# Altium PCB PCB1.PcbDoc
Units mm, origin at the board's own origin, x right, y up, seen from the top; angles counter-clockwise.
Board outline 100.24 x 20.75 mm, 2 copper layers (Top Layer, Bottom Layer); 2 components, 4 nets, 340 pads, 0 vias.
Unrouted connection lines stored in the file: 144.
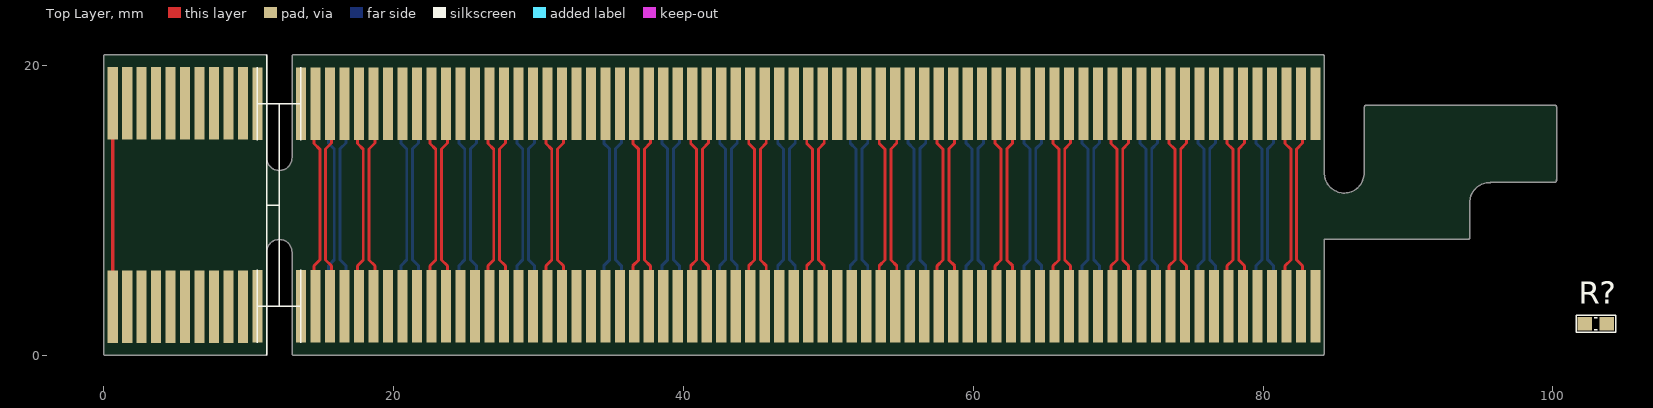
[diagram p0: Top Layer view]
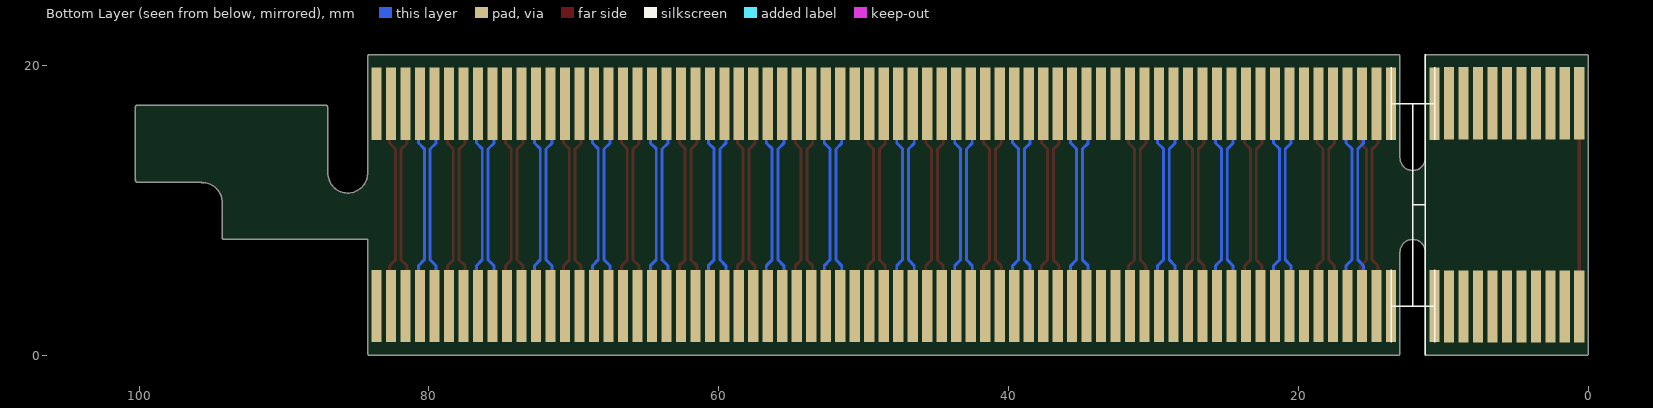
[diagram p1: Bottom Layer view, seen from below]

## Layer stack, top to bottom
Top Solder: solder mask 0.0102, Solder Resist, Dk 3.5
Top Layer: signal copper 0.0356
Dielectric 1: dielectric 0.32, FR-4, Dk 4.8
Bottom Layer: signal copper 0.0356
Bottom Solder: solder mask 0.0102, Solder Resist, Dk 3.5

## Board outline
0.127,0 cw(c0.127,0.127) 0,0.127 0,20.625 cw(c0.127,20.625) 0.127,20.752 11.125,20.752 cw(c11.125,20.625) 11.253,20.625 11.253,13.648 cw(c11.127,13.627) 11.254,13.627 ccw(c12.127,13.627) 13,13.627 cw(c13.127,13.627) 13.004,13.662 13.004,20.625 cw(c13.132,20.625) 13.132,20.752 84.099,20.752 cw(c84.099,20.625) 84.227,20.625 84.227,12.511 ccw(c85.598,12.573) 86.971,12.573 cw(c87.098,12.573) 86.995,12.647 86.995,17.145 cw(c87.122,17.145) 87.122,17.272 100.117,17.272 cw(c100.117,17.145) 100.244,17.145 100.244,12.141 cw(c100.117,12.141) 100.239,12.103 cw(c100.117,12.065) 100.244,12.065 cw(c100.117,12.065) 100.117,11.938 95.705,11.938 cw(c95.631,12.041) 95.631,11.914 ccw(c95.631,10.541) 94.258,10.541 cw(c94.131,10.541) 94.256,10.519 cw(c94.132,10.49) 94.26,10.49 94.26,8.127 cw(c94.132,8.127) 94.132,8 84.208,8 84.208,0.127 cw(c84.081,0.127) 84.081,0 13.132,0 cw(c13.132,0.127) 13.004,0.127 13.004,7.092 cw(c13.127,7.127) 13,7.127 ccw(c12.127,7.127) 11.254,7.127 cw(c11.127,7.127) 11.253,7.106 11.253,0.127 cw(c11.125,0.127) 11.125,0

## Design rules (kind name [scope] priority, off if disabled: settings)
Clearance [All] p1: gap=0.254 ignorepadtopadclearanceinfootprint=FALSE except(0: Arc-Hole Track-Hole SMDPad-Hole THPad-Hole Via-Hole Fill-Hole Poly-Hole Region-Hole Text-Hole)
DiffPairsRouting [All] p1: maxlimit=0.254 minlimit=0.15 mostfreqgap=0.2 toplayer_minwidth=0.15 toplayer_maxwidth=0.2 toplayer_prefwidth=0.15 bottomlayer_minwidth=0.15 bottomlayer_maxwidth=0.2 bottomlayer_prefwidth=0.15 maxuncoupledlength=12.7
PolygonConnect [All] p1: connectstyle=Relief reliefconductorwidth=0.254 reliefentries=4 polygonreliefangle="90 Angle" airgapwidth=0.254
RoomDefinition Sheet1 [InComponentClass('Sheet1')] p1: confinementstyle=ConfineIn formatcopy=TRUE lockcomponents=FALSE outline 101.397,1.422 104.724,1.422 104.724,5.486 101.397,5.486
RoutingVias [All] p1: holewidth=0.711 width=1.27 viastyle="Through Hole" minholewidth=0.711 minwidth=1.27 maxholewidth=0.711 maxwidth=1.27
SolderMaskExpansion [All] p1: expansion=0.102 istentingtop=FALSE
Width [All] p1: maxlimit=0.254 minlimit=0.254 preferedwidth=0.254
29 further rules are at their usual default settings.

## Classes and differential pairs
component class Sheet1: R?
differential pair visai: +visai_P -visai_N

## Components (designator, comment, footprint, x,y, rotation, side; value= is the part's Value field where it differs from the comment)
R? "0R" "tro smd 0603" 102.946,2.184 r0 top
R? "0R" "tro smd 0603" 102.946,2.184 r0 top

## Footprints (in the part's own frame and the unit in brackets; to place one, negate y for a bottom-side part, rotate by r counter-clockwise, add the part's x,y. Pads: shape width x height; smd on the part's side, far side on the other; paste and mask are expansions set on the pad)
"tro smd 0603" [mm] "Chip Capacitor, 2-Leads, Body 1,60x0,80mm, IPC Medium Density"
  rect 1x0.95 smd mask+0.076: 1(-0.75,0) 2(0.75,0)
  silkscreen extent -1.35,-0.58 1.37,0.58, body extent -0.82,-0.42 0.82,0.43, height 0.44

## Part data
R? R?: library part "Tro 0603 1% 0R", "Dán", Chung_Loai=Dán, Don_Vi=Con, Ma_Hang=MH005792, So_Chan=2, Ten_Linh_Kien="Trở 0603 1% 0R"

## Free pads (board coordinates)
  rect 0.7x5 smd far side: A0(0.628,3.372) A0(0.628,17.403) A1(1.628,3.372) A1(1.628,17.403) A2(2.628,3.372) A2(2.628,17.403) A3(3.628,3.372) A3(3.628,17.403) A4(4.628,3.372) A4(4.628,17.403) A5(5.628,3.372) A5(5.628,17.403) A6(6.628,3.372) A6(6.628,17.403) A7(7.628,3.372) A7(7.628,17.403) A8(8.628,3.372) A8(8.628,17.403) A9(9.628,17.403) A9(9.628,3.372) A10(10.613,3.407) A10(10.613,17.368) A11(10.613,3.407) A11(10.613,17.368) A11(13.618,3.407) A11(13.618,3.407) A11(13.618,17.368) A11(13.618,17.368) A12(14.618,3.407) A12(14.618,17.368) A13(15.618,3.407) A13(15.618,17.368) A14(16.618,3.407) A14(16.618,17.368) A15(17.618,3.407) A15(17.618,17.368) A16(18.618,3.407) A16(18.618,17.368) A17(19.618,3.407) A17(19.618,17.368) A18(20.618,3.407) A18(20.618,17.368) A19(21.618,3.407) A19(21.618,17.368) A20(22.618,3.407) A20(22.618,17.368) A21(23.618,3.407) A21(23.618,17.368) A22(24.618,3.407) A22(24.618,17.368) A23(25.618,3.407) A23(25.618,17.368) A24(26.618,3.407) A24(26.618,17.368) A25(27.618,3.407) A25(27.618,17.368) A26(28.618,3.407) A26(28.618,17.368) A27(29.618,3.407) A27(29.618,17.368) A28(30.618,3.407) A28(30.618,17.368) A29(31.618,3.407) A29(31.618,17.368) A30(32.618,3.407) A30(32.618,17.368) A31(33.618,3.407) A31(33.618,17.368) A32(34.618,3.407) A32(34.618,17.368) A33(35.618,3.407) A33(35.618,17.368) A34(36.618,3.407) A34(36.618,17.368) A35(37.618,3.407) A35(37.618,17.368) A36(38.618,3.407) A36(38.618,17.368) A37(39.618,3.407) A37(39.618,17.368) A38(40.618,3.407) A38(40.618,17.368) A39(41.618,3.407) A39(41.618,17.368) A40(42.618,3.407) A40(42.618,17.368) A41(43.618,3.407) A41(43.618,17.368) A42(44.618,3.407) A42(44.618,17.368) A43(45.618,3.407) A43(45.618,17.368) A44(46.618,3.407) A44(46.618,17.368) A45(47.618,3.407) A45(47.618,17.368) A46(48.618,3.407) A46(48.618,17.368) A47(49.618,3.407) A47(49.618,17.368) A48(50.618,3.407) A48(50.618,17.368) A49(51.618,3.407) A49(51.618,17.368) A50(52.618,3.407) A50(52.618,17.368) A51(53.618,3.407) A51(53.618,17.368) A52(54.618,3.407) A52(54.618,17.368) A53(55.618,3.407) A53(55.618,17.368) A54(56.618,3.407) A54(56.618,17.368) A55(57.618,3.407) A55(57.618,17.368) A56(58.618,3.407) A56(58.618,17.368) A57(59.618,3.407) A57(59.618,17.368) A58(60.618,3.407) A58(60.618,17.368) A59(61.618,3.407) A59(61.618,17.368) A60(62.618,3.407) A60(62.618,17.368) A61(63.618,3.407) A61(63.618,17.368) A62(64.618,3.407) A62(64.618,17.368) A63(65.618,3.407) A63(65.618,17.368) A64(66.618,3.407) A64(66.618,17.368) A65(67.618,3.407) A65(67.618,17.368) A66(68.618,3.407) A66(68.618,17.368) A67(69.618,3.407) A67(69.618,17.368) A68(70.618,3.407) A68(70.618,17.368) A69(71.618,3.407) A69(71.618,17.368) A70(72.618,3.407) A70(72.618,17.368) A71(73.618,3.407) A71(73.618,17.368) A72(74.618,3.407) A72(74.618,17.368) A73(75.618,3.407) A73(75.618,17.368) A74(76.618,3.407) A74(76.618,17.368) A75(77.618,3.407) A75(77.618,17.368) A76(78.618,3.407) A76(78.618,17.368) A77(79.618,3.407) A77(79.618,17.368) A78(80.618,3.407) A78(80.618,17.368) A79(81.618,3.407) A79(81.618,17.368) A80(82.618,3.407) A80(82.618,17.368) A81(83.618,3.407) A81(83.618,17.368)
  rect 0.7x5 smd: A0(0.628,3.361) A0(0.628,17.391) A1(1.628,3.361) A1(1.628,17.391) A2(2.628,3.361) A2(2.628,17.391) A3(3.628,3.361) A3(3.628,17.391) A4(4.628,3.361) A4(4.628,17.391) A5(5.628,3.361) A5(5.628,17.391) A6(6.628,3.361) A6(6.628,17.391) A7(7.628,3.361) A7(7.628,17.391) A8(8.628,3.361) A8(8.628,17.391) A9(9.628,17.391) A9(9.628,3.361) A10(10.614,3.395) A10(10.614,17.356) A11(10.614,3.395) A11(10.614,17.356) A11(13.618,3.395) A11(13.618,3.395) A11(13.618,17.356) A11(13.618,17.356) A12(14.618,3.395) A12(14.618,17.356) A13(15.618,3.395) A13(15.618,17.356) A14(16.618,3.395) A14(16.618,17.356) A15(17.618,3.395) A15(17.618,17.356) A16(18.618,3.395) A16(18.618,17.356) A17(19.618,3.395) A17(19.618,17.356) A18(20.618,3.395) A18(20.618,17.356) A19(21.618,3.395) A19(21.618,17.356) A20(22.618,3.395) A20(22.618,17.356) A21(23.618,3.395) A21(23.618,17.356) A22(24.618,3.395) A22(24.618,17.356) A23(25.618,3.395) A23(25.618,17.356) A24(26.618,3.395) A24(26.618,17.356) A25(27.618,3.395) A25(27.618,17.356) A26(28.618,3.395) A26(28.618,17.356) A27(29.618,3.395) A27(29.618,17.356) A28(30.618,3.395) A28(30.618,17.356) A29(31.618,3.395) A29(31.618,17.356) A30(32.618,3.395) A30(32.618,17.356) A31(33.618,3.395) A31(33.618,17.356) A32(34.618,3.395) A32(34.618,17.356) A33(35.618,3.395) A33(35.618,17.356) A34(36.618,3.395) A34(36.618,17.356) A35(37.618,3.395) A35(37.618,17.356) A36(38.618,3.395) A36(38.618,17.356) A37(39.618,3.395) A37(39.618,17.356) A38(40.618,3.395) A38(40.618,17.356) A39(41.618,3.395) A39(41.618,17.356) A40(42.618,3.395) A40(42.618,17.356) A41(43.618,3.395) A41(43.618,17.356) A42(44.618,3.395) A42(44.618,17.356) A43(45.618,3.395) A43(45.618,17.356) A44(46.618,3.395) A44(46.618,17.356) A45(47.618,3.395) A45(47.618,17.356) A46(48.618,3.395) A46(48.618,17.356) A47(49.618,3.395) A47(49.618,17.356) A48(50.618,3.395) A48(50.618,17.356) A49(51.618,3.395) A49(51.618,17.356) A50(52.618,3.395) A50(52.618,17.356) A51(53.618,3.395) A51(53.618,17.356) A52(54.618,3.395) A52(54.618,17.356) A53(55.618,3.395) A53(55.618,17.356) A54(56.618,3.395) A54(56.618,17.356) A55(57.618,3.395) A55(57.618,17.356) A56(58.618,3.395) A56(58.618,17.356) A57(59.618,3.395) A57(59.618,17.356) A58(60.618,3.395) A58(60.618,17.356) A59(61.618,3.395) A59(61.618,17.356) A60(62.618,3.395) A60(62.618,17.356) A61(63.618,3.395) A61(63.618,17.356) A62(64.618,3.395) A62(64.618,17.356) A63(65.618,3.395) A63(65.618,17.356) A64(66.618,3.395) A64(66.618,17.356) A65(67.618,3.395) A65(67.618,17.356) A66(68.618,3.395) A66(68.618,17.356) A67(69.618,3.395) A67(69.618,17.356) A68(70.618,3.395) A68(70.618,17.356) A69(71.618,3.395) A69(71.618,17.356) A70(72.618,3.395) A70(72.618,17.356) A71(73.618,3.395) A71(73.618,17.356) A72(74.618,3.395) A72(74.618,17.356) A73(75.618,3.395) A73(75.618,17.356) A74(76.618,3.395) A74(76.618,17.356) A75(77.618,3.395) A75(77.618,17.356) A76(78.618,3.395) A76(78.618,17.356) A77(79.618,3.395) A77(79.618,17.356) A78(80.618,3.395) A78(80.618,17.356) A79(81.618,3.395) A79(81.618,17.356) A80(82.618,3.395) A80(82.618,17.356) A81(83.618,3.395) A81(83.618,17.356)

## Nets (pads, with @x,y where several pads share a name; then routed paths per layer and width w, separated by ;. In a path a pad name is that pad's centre, name@x,y a point inside that pad or via, vN(x,y) a via of type N, cw(c..) or ccw(c..) an arc to the next point about the centre after c; other vN are vias at no path point)
GND: pad.A11@13.618,3.395 pad.A11@13.618,17.356 pad.A12@14.618,3.407 pad.A12@14.618,17.368 pad.A14@16.618,3.395 pad.A14@16.618,17.356 pad.A15@17.618,3.407 pad.A15@17.618,17.368 pad.A17 pad.A19@21.618,3.395 pad.A19@21.618,17.356 pad.A20@22.618,3.407 pad.A20@22.618,17.368 pad.A21@23.618,3.407 pad.A21@23.618,17.368 pad.A22@24.618,3.395 pad.A22@24.618,17.356 pad.A23@25.618,3.395 pad.A23@25.618,17.356 pad.A24@26.618,3.407 pad.A24@26.618,17.368 pad.A25@27.618,3.407 pad.A25@27.618,17.368 pad.A26@28.618,3.395 pad.A26@28.618,17.356 pad.A27@29.618,3.395 pad.A27@29.618,17.356 pad.A28@30.618,3.407 pad.A28@30.618,17.368 pad.A30@32.618,3.395 pad.A30@32.618,17.356 pad.A31@33.618,3.407 pad.A31@33.618,17.368 pad.A33@35.618,3.395 pad.A33@35.618,17.356 pad.A34@36.618,3.407 pad.A34@36.618,17.368 pad.A35@37.618,3.407 pad.A35@37.618,17.368 pad.A36@38.618,3.395 pad.A36@38.618,17.356 pad.A37@39.618,3.395 pad.A37@39.618,17.356 pad.A38@40.618,3.407 pad.A38@40.618,17.368 pad.A39@41.618,3.407 pad.A39@41.618,17.368 pad.A40@42.618,3.395 pad.A40@42.618,17.356 pad.A41@43.618,3.395 pad.A41@43.618,17.356 pad.A42@44.618,3.407 pad.A42@44.618,17.368 pad.A43@45.618,3.407 pad.A43@45.618,17.368 pad.A44@46.618,3.395 pad.A44@46.618,17.356 pad.A45@47.618,3.395 pad.A45@47.618,17.356 pad.A46@48.618,3.407 pad.A46@48.618,17.368 pad.A48 pad.A50@52.618,3.395 pad.A50@52.618,17.356 pad.A51@53.618,3.407 pad.A51@53.618,17.368 pad.A52@54.618,3.407 pad.A52@54.618,17.368 pad.A53@55.618,3.395 pad.A53@55.618,17.356 pad.A54@56.618,3.395 pad.A54@56.618,17.356 pad.A55@57.618,3.407 pad.A55@57.618,17.368 pad.A56@58.618,3.407 pad.A56@58.618,17.368 pad.A57@59.618,3.395 pad.A57@59.618,17.356 pad.A58@60.618,3.395 pad.A58@60.618,17.356 pad.A59@61.618,3.407 pad.A59@61.618,17.368 pad.A60@62.618,3.407 pad.A60@62.618,17.368 pad.A61@63.618,3.395 pad.A61@63.618,17.356 pad.A62@64.618,3.395 pad.A62@64.618,17.356 pad.A63@65.618,3.407 pad.A63@65.618,17.368 pad.A64@66.618,3.407 pad.A64@66.618,17.368 pad.A65@67.618,3.395 pad.A65@67.618,17.356 pad.A66@68.618,3.395 pad.A66@68.618,17.356 pad.A67@69.618,3.407 pad.A67@69.618,17.368 pad.A68@70.618,3.407 pad.A68@70.618,17.368 pad.A69@71.618,3.395 pad.A69@71.618,17.356 pad.A70@72.618,3.395 pad.A70@72.618,17.356 pad.A71@73.618,3.407 pad.A71@73.618,17.368 pad.A72@74.618,3.407 pad.A72@74.618,17.368 pad.A73@75.618,3.395 pad.A73@75.618,17.356 pad.A74@76.618,3.395 pad.A74@76.618,17.356 pad.A75@77.618,3.407 pad.A75@77.618,17.368 pad.A76@78.618,3.407 pad.A76@78.618,17.368 pad.A77@79.618,3.395 pad.A77@79.618,17.356 pad.A78@80.618,3.395 pad.A78@80.618,17.356 pad.A79@81.618,3.407 pad.A79@81.618,17.368 pad.A81@83.618,3.395 pad.A81@83.618,17.356 R?.1@102.196,2.184 | length 28.8
  Bottom Layer w0.2: 79.618,3.407 79.618,5.652 79.514,5.756 79.514,6.189 79.918,6.593 79.918,14.232 79.514,14.636 79.514,15.044 79.618,15.148 79.618,17.368 ; 80.618,3.407 80.618,5.651 80.722,5.756 80.722,6.189 80.318,6.593 80.318,14.257 80.722,14.662 80.722,15.044 80.618,15.149 80.618,17.368
VCC: pad.A0@0.628,3.372 pad.A0@0.628,17.403 pad.A1 pad.A2 R?.2@103.696,2.184
visai_N: pad.A80@82.618,3.395 pad.A80@82.618,17.356 R?.2@103.696,2.184 | length 14.4
  Top Layer w0.2: pad.A80@82.618,3.395 82.618,5.64 82.722,5.744 82.722,6.178 82.318,6.582 82.318,14.246 82.722,14.65 82.722,15.033 82.618,15.137 pad.A80@82.618,17.356
visai_P: pad.A79@81.618,3.395 pad.A79@81.618,17.356 R?.1@102.196,2.184 | length 14.4
  Top Layer w0.2: pad.A79@81.618,3.395 81.618,5.64 81.514,5.744 81.514,6.178 81.918,6.582 81.918,14.221 81.514,14.625 81.514,15.033 81.618,15.137 pad.A79@81.618,17.356
copper on no net: | length 905.7
  Top Layer w0.2: 14.618,3.395 14.618,5.64 14.514,5.744 14.514,6.178 14.918,6.582 14.918,14.221 14.514,14.625 14.514,15.033 14.618,15.137 14.618,17.356 ; 15.618,3.395 15.618,5.64 15.722,5.744 15.722,6.178 15.318,6.582 15.318,14.246 15.722,14.65 15.722,15.033 15.618,15.137 15.618,17.356 ; 17.618,3.395 17.618,5.64 17.514,5.744 17.514,6.178 17.918,6.582 17.918,14.221 17.514,14.625 17.514,15.033 17.618,15.137 17.618,17.356 ; 18.618,3.395 18.618,5.64 18.722,5.744 18.722,6.178 18.318,6.582 18.318,14.246 18.722,14.65 18.722,15.033 18.618,15.137 18.618,17.356 ; 22.618,3.395 22.618,5.64 22.514,5.744 22.514,6.178 22.918,6.582 22.918,14.221 22.514,14.625 22.514,15.033 22.618,15.137 22.618,17.356 ; 23.618,3.395 23.618,5.64 23.722,5.744 23.722,6.178 23.318,6.582 23.318,14.246 23.722,14.65 23.722,15.033 23.618,15.137 23.618,17.356 ; 26.618,3.395 26.618,5.64 26.514,5.744 26.514,6.178 26.918,6.582 26.918,14.221 26.514,14.625 26.514,15.033 26.618,15.137 26.618,17.356 ; 27.618,3.395 27.618,5.64 27.722,5.744 27.722,6.178 27.318,6.582 27.318,14.246 27.722,14.65 27.722,15.033 27.618,15.137 27.618,17.356 ; 30.618,3.395 30.618,5.64 30.514,5.744 30.514,6.178 30.918,6.582 30.918,14.221 30.514,14.625 30.514,15.033 30.618,15.137 30.618,17.356 ; 31.618,3.395 31.618,5.64 31.722,5.744 31.722,6.178 31.318,6.582 31.318,14.246 31.722,14.65 31.722,15.033 31.618,15.137 31.618,17.356 ; 36.618,3.395 36.618,5.64 36.514,5.744 36.514,6.178 36.918,6.582 36.918,14.221 36.514,14.625 36.514,15.033 36.618,15.137 36.618,17.356 ; 37.618,3.395 37.618,5.64 37.722,5.744 37.722,6.178 37.318,6.582 37.318,14.246 37.722,14.65 37.722,15.033 37.618,15.137 37.618,17.356 ; 40.618,3.395 40.618,5.64 40.514,5.744 40.514,6.178 40.918,6.582 40.918,14.221 40.514,14.625 40.514,15.033 40.618,15.137 40.618,17.356 ; 41.618,3.395 41.618,5.64 41.722,5.744 41.722,6.178 41.318,6.582 41.318,14.246 41.722,14.65 41.722,15.033 41.618,15.137 41.618,17.356 ; 44.618,3.395 44.618,5.64 44.514,5.744 44.514,6.178 44.918,6.582 44.918,14.221 44.514,14.625 44.514,15.033 44.618,15.137 44.618,17.356 ; 45.618,3.395 45.618,5.64 45.722,5.744 45.722,6.178 45.318,6.582 45.318,14.246 45.722,14.65 45.722,15.033 45.618,15.137 45.618,17.356 ; 48.618,3.395 48.618,5.64 48.514,5.744 48.514,6.178 48.918,6.582 48.918,14.221 48.514,14.625 48.514,15.033 48.618,15.137 48.618,17.356 ; 49.618,3.395 49.618,5.64 49.722,5.744 49.722,6.178 49.318,6.582 49.318,14.246 49.722,14.65 49.722,15.033 49.618,15.137 49.618,17.356 ; 53.618,3.395 53.618,5.64 53.514,5.744 53.514,6.178 53.918,6.582 53.918,14.221 53.514,14.625 53.514,15.033 53.618,15.137 53.618,17.356 ; 54.618,3.395 54.618,5.64 54.722,5.744 54.722,6.178 54.318,6.582 54.318,14.246 54.722,14.65 54.722,15.033 54.618,15.137 54.618,17.356 ; 57.618,3.395 57.618,5.64 57.514,5.744 57.514,6.178 57.918,6.582 57.918,14.221 57.514,14.625 57.514,15.033 57.618,15.137 57.618,17.356 ; 58.618,3.395 58.618,5.64 58.722,5.744 58.722,6.178 58.318,6.582 58.318,14.246 58.722,14.65 58.722,15.033 58.618,15.137 58.618,17.356 ; 61.618,3.395 61.618,5.64 61.514,5.744 61.514,6.178 61.918,6.582 61.918,14.221 61.514,14.625 61.514,15.033 61.618,15.137 61.618,17.356 ; 62.618,3.395 62.618,5.64 62.722,5.744 62.722,6.178 62.318,6.582 62.318,14.246 62.722,14.65 62.722,15.033 62.618,15.137 62.618,17.356 ; 65.618,3.395 65.618,5.64 65.514,5.744 65.514,6.178 65.918,6.582 65.918,14.221 65.514,14.625 65.514,15.033 65.618,15.137 65.618,17.356 ; 66.618,3.395 66.618,5.64 66.722,5.744 66.722,6.178 66.318,6.582 66.318,14.246 66.722,14.65 66.722,15.033 66.618,15.137 66.618,17.356 ; 69.618,3.395 69.618,5.64 69.514,5.744 69.514,6.178 69.918,6.582 69.918,14.221 69.514,14.625 69.514,15.033 69.618,15.137 69.618,17.356 ; 70.618,3.395 70.618,5.64 70.722,5.744 70.722,6.178 70.318,6.582 70.318,14.246 70.722,14.65 70.722,15.033 70.618,15.137 70.618,17.356 ; 73.618,3.395 73.618,5.64 73.514,5.744 73.514,6.178 73.918,6.582 73.918,14.221 73.514,14.625 73.514,15.033 73.618,15.137 73.618,17.356 ; 74.618,3.395 74.618,5.64 74.722,5.744 74.722,6.178 74.318,6.582 74.318,14.246 74.722,14.65 74.722,15.033 74.618,15.137 74.618,17.356 ; 77.618,3.395 77.618,5.64 77.514,5.744 77.514,6.178 77.918,6.582 77.918,14.221 77.514,14.625 77.514,15.033 77.618,15.137 77.618,17.356 ; 78.618,3.395 78.618,5.64 78.722,5.744 78.722,6.178 78.318,6.582 78.318,14.246 78.722,14.65 78.722,15.033 78.618,15.137 78.618,17.356
  Top Layer w0.254: 0.584,17.069 0.628,17.069 ; 0.628,3.361 0.628,17.391
  Bottom Layer w0.2: 15.618,3.407 15.618,5.652 15.514,5.756 15.514,6.189 15.918,6.593 15.918,14.232 15.514,14.636 15.514,15.044 15.618,15.148 15.618,17.368 ; 16.618,3.407 16.618,5.651 16.722,5.756 16.722,6.189 16.318,6.593 16.318,14.257 16.722,14.662 16.722,15.044 16.618,15.149 16.618,17.368 ; 20.618,3.407 20.618,5.652 20.514,5.756 20.514,6.189 20.918,6.593 20.918,14.232 20.514,14.636 20.514,15.044 20.618,15.148 20.618,17.368 ; 21.618,3.407 21.618,5.651 21.722,5.756 21.722,6.189 21.318,6.593 21.318,14.257 21.722,14.662 21.722,15.044 21.618,15.149 21.618,17.368 ; 24.618,3.407 24.618,5.652 24.514,5.756 24.514,6.189 24.918,6.593 24.918,14.232 24.514,14.636 24.514,15.044 24.618,15.148 24.618,17.368 ; 25.618,3.407 25.618,5.651 25.722,5.756 25.722,6.189 25.318,6.593 25.318,14.257 25.722,14.662 25.722,15.044 25.618,15.149 25.618,17.368 ; 28.618,3.407 28.618,5.652 28.514,5.756 28.514,6.189 28.918,6.593 28.918,14.232 28.514,14.636 28.514,15.044 28.618,15.148 28.618,17.368 ; 29.618,3.407 29.618,5.651 29.722,5.756 29.722,6.189 29.318,6.593 29.318,14.257 29.722,14.662 29.722,15.044 29.618,15.149 29.618,17.368 ; 34.618,3.407 34.618,5.652 34.514,5.756 34.514,6.189 34.918,6.593 34.918,14.232 34.514,14.636 34.514,15.044 34.618,15.148 34.618,17.368 ; 35.618,3.407 35.618,5.651 35.722,5.756 35.722,6.189 35.318,6.593 35.318,14.257 35.722,14.662 35.722,15.044 35.618,15.149 35.618,17.368 ; 38.618,3.407 38.618,5.652 38.514,5.756 38.514,6.189 38.918,6.593 38.918,14.232 38.514,14.636 38.514,15.044 38.618,15.148 38.618,17.368 ; 39.618,3.407 39.618,5.651 39.722,5.756 39.722,6.189 39.318,6.593 39.318,14.257 39.722,14.662 39.722,15.044 39.618,15.149 39.618,17.368 ; 42.618,3.407 42.618,5.652 42.514,5.756 42.514,6.189 42.918,6.593 42.918,14.232 42.514,14.636 42.514,15.044 42.618,15.148 42.618,17.368 ; 43.618,3.407 43.618,5.651 43.722,5.756 43.722,6.189 43.318,6.593 43.318,14.257 43.722,14.662 43.722,15.044 43.618,15.149 43.618,17.368 ; 46.618,3.407 46.618,5.652 46.514,5.756 46.514,6.189 46.918,6.593 46.918,14.232 46.514,14.636 46.514,15.044 46.618,15.148 46.618,17.368 ; 47.618,3.407 47.618,5.651 47.722,5.756 47.722,6.189 47.318,6.593 47.318,14.257 47.722,14.662 47.722,15.044 47.618,15.149 47.618,17.368 ; 51.618,3.407 51.618,5.652 51.514,5.756 51.514,6.189 51.918,6.593 51.918,14.232 51.514,14.636 51.514,15.044 51.618,15.148 51.618,17.368 ; 52.618,3.407 52.618,5.651 52.722,5.756 52.722,6.189 52.318,6.593 52.318,14.257 52.722,14.662 52.722,15.044 52.618,15.149 52.618,17.368 ; 55.618,3.407 55.618,5.652 55.514,5.756 55.514,6.189 55.918,6.593 55.918,14.232 55.514,14.636 55.514,15.044 55.618,15.148 55.618,17.368 ; 56.618,3.407 56.618,5.651 56.722,5.756 56.722,6.189 56.318,6.593 56.318,14.257 56.722,14.662 56.722,15.044 56.618,15.149 56.618,17.368 ; 59.618,3.407 59.618,5.652 59.514,5.756 59.514,6.189 59.918,6.593 59.918,14.232 59.514,14.636 59.514,15.044 59.618,15.148 59.618,17.368 ; 60.618,3.407 60.618,5.651 60.722,5.756 60.722,6.189 60.318,6.593 60.318,14.257 60.722,14.662 60.722,15.044 60.618,15.149 60.618,17.368 ; 63.618,3.407 63.618,5.652 63.514,5.756 63.514,6.189 63.918,6.593 63.918,14.232 63.514,14.636 63.514,15.044 63.618,15.148 63.618,17.368 ; 64.618,3.407 64.618,5.651 64.722,5.756 64.722,6.189 64.318,6.593 64.318,14.257 64.722,14.662 64.722,15.044 64.618,15.149 64.618,17.368 ; 67.618,3.407 67.618,5.652 67.514,5.756 67.514,6.189 67.918,6.593 67.918,14.232 67.514,14.636 67.514,15.044 67.618,15.148 67.618,17.368 ; 68.618,3.407 68.618,5.651 68.722,5.756 68.722,6.189 68.318,6.593 68.318,14.257 68.722,14.662 68.722,15.044 68.618,15.149 68.618,17.368 ; 71.618,3.407 71.618,5.652 71.514,5.756 71.514,6.189 71.918,6.593 71.918,14.232 71.514,14.636 71.514,15.044 71.618,15.148 71.618,17.368 ; 72.618,3.407 72.618,5.651 72.722,5.756 72.722,6.189 72.318,6.593 72.318,14.257 72.722,14.662 72.722,15.044 72.618,15.149 72.618,17.368 ; 75.618,3.407 75.618,5.652 75.514,5.756 75.514,6.189 75.918,6.593 75.918,14.232 75.514,14.636 75.514,15.044 75.618,15.148 75.618,17.368 ; 76.618,3.407 76.618,5.651 76.722,5.756 76.722,6.189 76.318,6.593 76.318,14.257 76.722,14.662 76.722,15.044 76.618,15.149 76.618,17.368

## Silkscreen, mask and mechanical layers (free items; w line width, h text height)
Top Overlay:
  lines w0.1: 10.617,0.889 10.617,5.893 ; 10.617,3.391 12.116,3.391 ; 10.617,14.859 10.617,19.863 ; 10.617,17.361 12.116,17.361 ; 11.252,0 11.252,20.752 11.252,14.752 ; 11.252,10.376 12.116,10.376 ; 13.614,0.889 13.614,5.893 ; 13.614,3.391 12.116,3.391 ; 13.614,14.859 13.614,19.863 ; 13.614,17.361 12.116,17.361 ; 12.116,3.391 12.116,10.376 ; 12.116,10.376 12.116,17.361
Bottom Overlay:
  lines w0.1: 10.617,0.9 10.617,5.904 ; 10.617,3.402 12.116,3.402 ; 10.617,14.87 10.617,19.874 ; 10.617,17.372 12.116,17.372 ; 11.252,0.011 11.252,20.763 11.252,14.763 ; 11.252,10.387 12.116,10.387 ; 13.614,0.9 13.614,5.904 ; 13.614,3.402 12.116,3.402 ; 13.614,14.87 13.614,19.874 ; 13.614,17.372 12.116,17.372 ; 12.116,3.402 12.116,10.387 ; 12.116,10.387 12.116,17.372